# Altium PCB RK839.PcbDoc (part 3 of 3)
Units mm, origin at the board's own origin, x right, y up, seen from the top; angles counter-clockwise.
Board outline 303.12 x 189.36 mm, 2 copper layers (TopLayer, BottomLayer); 307 components, 971 nets, 714 pads, 1012 vias.
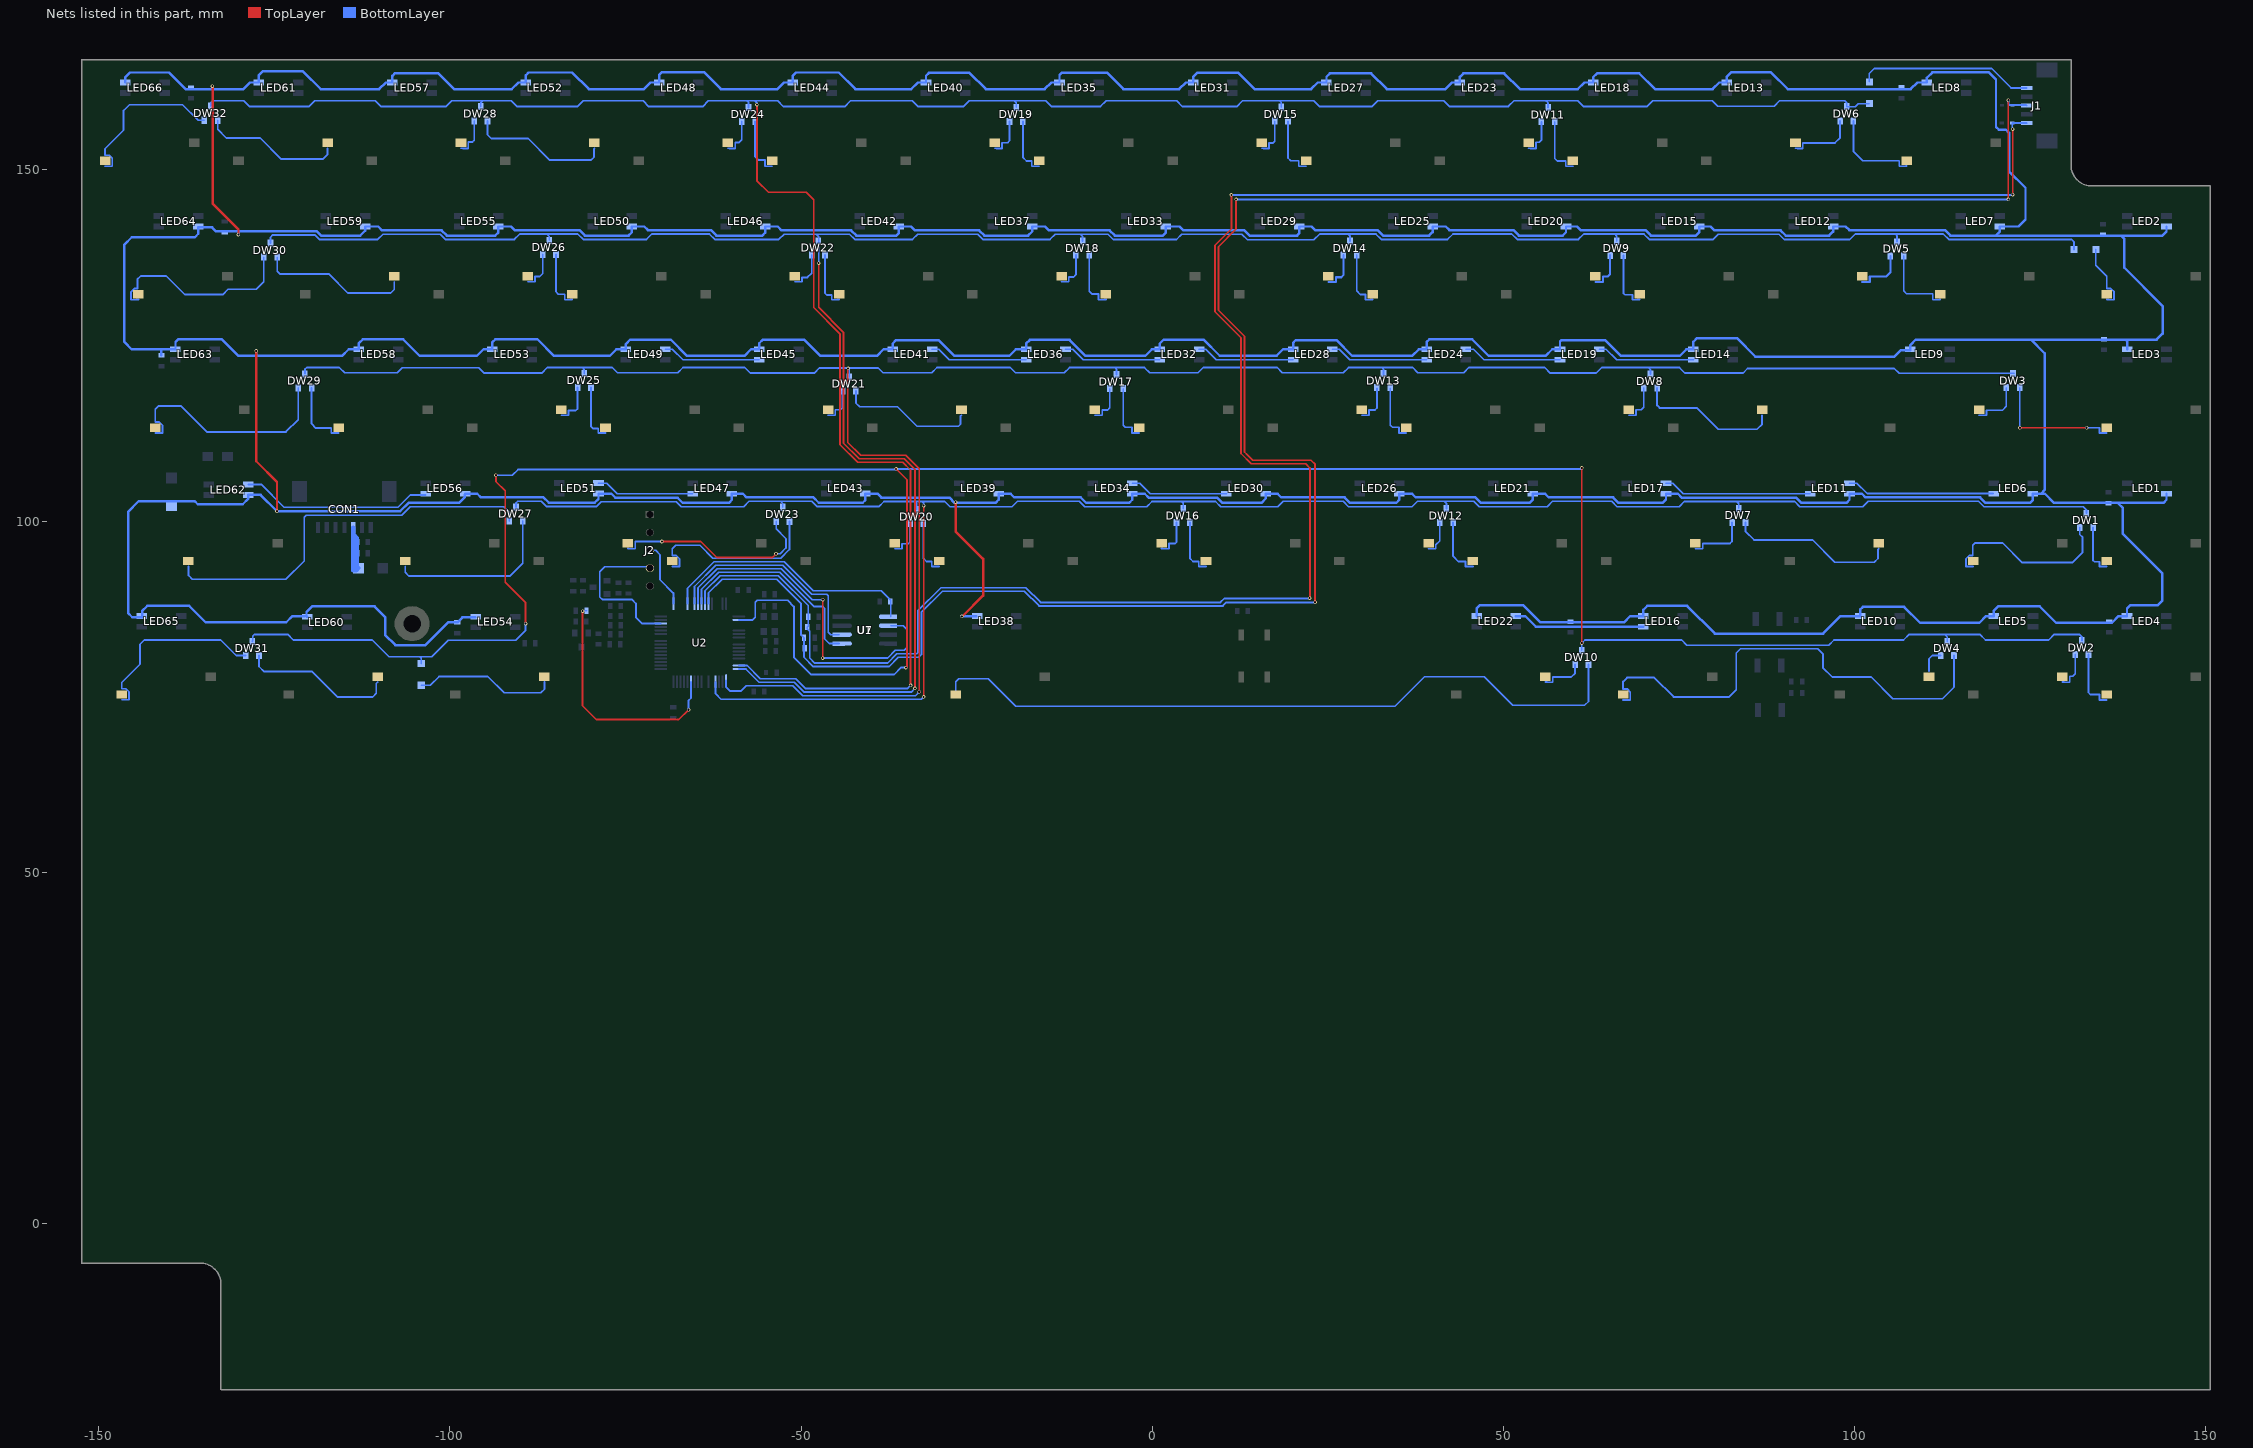
[diagram p3: the nets of this part, all layers, seen from the top]

## Via types
v1: diameter 0.5, hole 0.3, TopLayer to BottomLayer, tented both sides, 1012 vias

## Nets (pads, with @x,y where several pads share a name; then routed paths per layer and width w, separated by ;. In a path a pad name is that pad's centre, name@x,y a point inside that pad or via, vN(x,y) a via of type N, cw(c..) or ccw(c..) an arc to the next point about the centre after c; other vN are vias at no path point) (continued)
LEDVCC: C1.1 C2.2 C3.2 C4.1 C5.2 C6.1 C23.1 C25.2 C26.2 C27.1 LED1.4 LED2.4 LED3.4 LED4.4 LED5.4 LED6.4 LED7.4 LED8.4 LED9.4 LED10.4 LED11.4 LED12.4 LED13.4 LED14.4 LED15.4 LED16.4 LED17.4 LED18.4 LED19.4 LED20.4 LED21.4 LED22.4 LED23.4 LED24.4 LED25.4 LED26.4 LED27.4 LED28.4 LED29.4 LED30.4 LED31.4 LED32.4 LED33.4 LED34.4 LED35.4 LED36.4 LED37.4 LED38.4 LED39.4 LED40.4 LED41.4 LED42.4 LED43.4 LED44.4 LED45.4 LED46.4 LED47.4 LED48.4 LED49.4 LED50.4 LED51.4 LED52.4 LED53.4 LED54.4 LED55.4 LED56.4 LED57.4 LED58.4 LED59.4 LED60.4 LED61.4 LED62.4 LED63.4 LED64.4 LED65.4 LED66.4 R15.2 | length 1599.9
  TopLayer w0.35: v1(-133.825,161.95) -133.8,161.925 -133.8,145.197 -130.106,141.504 v1(-130.106,140.8) ; v1(-127.575,124.25) -127.575,108.525 -124.626,105.576 v1(-124.626,101.401) ; v1(-28,102.7) -28,98.525 -24.1,94.625 -24.1,89.4 -27.06,86.44 v1(-27.125,86.44)
  BottomLayer w0.35: LED66.4@-146.2,162.45 -146.2,163.225 -145.55,163.875 -140,163.875 -137.625,161.5 -133.825,161.5 ; C27.1@-141.075,123.587 -141.075,124.275 -141.275,124.475 ; v1(-133.825,161.95) -133.825,161.5 ; v1(-130.106,140.8) -130.106,141.094 -129.9,141.3 ; v1(-127.575,124.25) -127.575,123.7 -127.75,123.525 ; LED60.4@-120.675,86.475 -122.425,86.475 -123.3,85.6 -134.785,85.6 -137.11,87.925 -143.1,87.925 -143.84,87.185 -143.84,86.31 -145.234,86.31 -145.825,86.901 -145.825,101.325 -144.3,102.85 -136.35,102.85 -135.906,102.406 -129.5,102.406 -128.731,103.175 LED62.4@-128.731,103.726 -126.95,103.726 v1(-124.626,101.401) -107.099,101.401 -105.894,102.606 -98.705,102.606 -97.861,103.45 LED56.4@-97.861,103.728 ; LED60.4@-120.325,86.375 -120.425,86.475 -120.425,87.05 -119.625,87.85 -110.725,87.85 -109.225,86.35 -109.225,83.8 -107.776,82.351 -103.499,82.351 -100.263,85.587 C23.1@-98.95,85.587 -98.237,86.3 LED54.4@-96.425,86.3 ; LED56.4@-97.85,103.9 -96.113,103.9 -95.596,103.383 -86.683,103.383 -85.922,102.622 -79.402,102.622 -78.85,103.175 -78.85,103.9 -77.013,103.9 -76.438,103.325 -67.575,103.325 -66.856,102.606 -60.294,102.606 -59.86,103.04 LED47.4@-59.86,103.9 -58.278,103.9 -57.761,103.383 -48.249,103.383 -47.489,102.623 -41.227,102.623 -40.85,103 LED43.4@-40.85,103.925 -39.153,103.925 -38.578,103.35 -28.9,103.35 -28.156,102.606 -28,102.606 -22.319,102.606 -21.875,103.05 LED39.4@-21.875,103.9 -20.178,103.9 -19.661,103.383 -10.183,103.383 -9.406,102.606 -3.294,102.606 -2.85,103.05 LED34.4@-2.85,103.9 -1.078,103.9 -0.528,103.35 9.225,103.35 9.969,102.606 15.531,102.606 16.15,103.225 LED30.4@16.15,103.9 17.847,103.9 18.364,103.383 27.392,103.383 28.169,102.606 34.731,102.606 35.15,103.025 LED26.4@35.15,103.9 36.997,103.9 37.514,103.383 46.017,103.383 46.794,102.606 53.731,102.606 54.139,103.014 LED21.4@54.139,103.9 55.922,103.9 56.439,103.383 65.617,103.383 66.394,102.606 72.656,102.606 73.137,103.087 LED17.4@73.137,103.9 74.822,103.9 75.372,103.35 91.675,103.35 92.425,102.6 98.825,102.6 99.265,103.04 LED11.4@99.265,103.9 101.047,103.9 101.564,103.383 117.867,103.383 118.644,102.606 124.981,102.606 125.38,103.005 LED6.4@125.38,103.9 126.5,103.9 ; v1(-27.125,86.44) -25.117,86.44 LED38.4@-25.082,86.475 ; LED22.4@46.175,86.475 46.175,87.575 46.65,88.05 52.8,88.05 55.275,85.575 59.55,85.575 67.15,85.575 68.05,86.475 LED16.4@69.925,86.475 69.925,87.375 70.475,87.925 76.151,87.925 80.101,83.975 95.51,83.975 98.01,86.475 LED10.4@100.798,86.475 100.798,87.423 101.175,87.8 107.05,87.8 109.325,85.525 117.75,85.525 118.7,86.475 LED5.4@119.789,86.475 119.789,87.214 120.425,87.85 126.35,87.85 128.675,85.525 136.231,85.525 136.632,85.525 137.582,86.475 LED4.4@138.775,86.475 138.775,87.575 139.213,88.012 143.137,88.012 143.825,88.7 143.825,92.547 138.2,98.172 138.2,101.856 137.45,102.606 ; LED3.4@138.8,124.475 138.8,125.65 138.6,125.85 ; LED1.4@144.4,103.9 144.4,103.05 143.956,102.606 137.45,102.606 ; LED2.4@144.4,141.95 144.4,141.225 143.831,140.656 137.925,140.656 ; -141.275,124.475 LED63.4@-139.077,124.475 -139.077,125.498 -138.7,125.875 -132.475,125.875 -130.125,123.525 -127.75,123.525 ; -141.275,124.475 -145.322,124.475 -146.35,125.503 -146.35,139.375 -145.3,140.425 -136.325,140.425 -135.836,140.914 -135.836,141.816 -133.868,141.816 -133.353,141.3 -132.075,141.3 -129.9,141.3 ; -133.825,161.5 -129.4,161.5 -128.45,162.45 LED61.4@-127.201,162.45 -127.201,163.499 -126.675,164.025 -120.925,164.025 -118.4,161.5 -110.075,161.5 -109.125,162.45 LED57.4@-108.201,162.45 -108.201,163.399 -107.8,163.8 -101.725,163.8 -99.425,161.5 -91.2,161.5 -90.25,162.45 LED52.4@-89.201,162.45 -89.201,163.474 -88.8,163.875 -82.6,163.875 -80.225,161.5 -72.375,161.5 -71.425,162.45 LED48.4@-70.226,162.45 -70.226,163.499 -69.8,163.925 -63.852,163.925 -61.427,161.5 -53.375,161.5 -52.425,162.45 LED44.4@-51.216,162.45 -51.216,163.384 -50.725,163.875 -44.65,163.875 -42.275,161.5 -34.325,161.5 -33.375,162.45 LED40.4@-32.221,162.45 -32.221,163.404 -31.8,163.825 -26.025,163.825 -23.7,161.5 -15.325,161.5 -14.375,162.45 LED35.4@-13.212,162.45 -13.212,163.513 -12.875,163.85 -6.475,163.85 -4.125,161.5 3.825,161.5 4.775,162.45 LED31.4@5.799,162.45 5.799,163.222 6.427,163.85 12.225,163.85 14.575,161.5 22.6,161.5 23.55,162.45 LED27.4@24.799,162.45 24.799,163.274 25.275,163.75 31.15,163.75 33.4,161.5 41.725,161.5 42.675,162.45 LED23.4@43.799,162.45 43.799,163.249 44.3,163.75 50.1,163.75 52.35,161.5 60.575,161.5 61.525,162.45 LED18.4@62.789,162.45 62.789,163.214 63.325,163.75 69.325,163.75 71.575,161.5 79.775,161.5 80.725,162.45 LED13.4@81.799,162.45 81.799,163.295 82.404,163.9 88.075,163.9 90.475,161.5 107.975,161.5 108.925,162.45 LED8.4@110.294,162.45 110.294,163.119 111.075,163.9 119.1,163.9 120.125,162.875 120.125,156.125 120.525,155.725 121.55,155.725 122,155.275 122,149.797 124.325,147.472 124.325,142.95 123.325,141.95 LED7.4@120.675,141.95 120.675,141.25 120.081,140.656 ; -129.9,141.3 -119,141.3 -118.356,140.656 -112.769,140.656 -112.075,141.35 LED59.4@-112.075,141.95 -110.203,141.95 -109.653,141.4 -101.175,141.4 -100.431,140.656 -93.544,140.656 -93.1,141.1 LED55.4@-93.1,141.95 -91.303,141.95 -90.786,141.433 -81.558,141.433 -80.781,140.656 -74.569,140.656 -74.1,141.125 LED50.4@-74.1,141.95 -72.328,141.95 -71.811,141.433 -62.833,141.433 -62.056,140.656 -55.519,140.656 -55.1,141.075 LED46.4@-55.1,141.95 -53.328,141.95 -52.778,141.4 -42.886,141.4 -42.142,140.656 -36.444,140.656 -36.075,141.025 LED42.4@-36.075,141.95 -34.353,141.95 -33.803,141.4 -24.65,141.4 -23.906,140.656 -17.694,140.656 -17.1,141.25 LED37.4@-17.1,141.95 -15.253,141.95 -14.703,141.4 -6.075,141.4 -5.325,140.65 1.525,140.65 1.9,141.025 LED33.4@1.9,141.95 3.872,141.95 4.422,141.4 13.1,141.4 13.844,140.656 20.606,140.656 20.9,140.95 LED29.4@20.9,141.95 22.647,141.95 23.164,141.433 32.067,141.433 32.844,140.656 39.406,140.656 39.9,141.15 LED25.4@39.9,141.95 41.772,141.95 42.289,141.433 51.417,141.433 52.186,140.664 58.439,140.664 58.9,141.125 LED20.4@58.9,141.95 60.472,141.95 60.989,141.433 70.217,141.433 70.994,140.656 77.406,140.656 77.9,141.15 LED15.4@77.9,141.95 79.497,141.95 80.047,141.4 89.45,141.4 90.194,140.656 90.946,140.656 90.952,140.65 96.35,140.65 96.925,141.225 LED12.4@96.925,141.95 98.722,141.95 99.239,141.433 112.842,141.433 113.619,140.656 120.081,140.656 ; -127.75,123.525 -115.35,123.525 -114.4,124.475 LED58.4@-112.957,124.475 -112.957,125.343 -112.4,125.9 -106.675,125.9 -104.3,123.525 -96.175,123.525 -95.225,124.475 LED53.4@-93.947,124.475 -93.947,125.478 -93.525,125.9 -87.55,125.9 -85.175,123.525 -77.25,123.525 -76.3,124.475 LED49.4@-74.957,124.475 -74.957,125.218 -74.35,125.825 -68.525,125.825 -66.225,123.525 -58.075,123.525 -57.125,124.475 LED45.4@-55.954,124.475 -55.954,125.321 -55.475,125.8 -49.525,125.8 -47.25,123.525 -39.2,123.525 -38.25,124.475 LED41.4@-36.957,124.475 -36.957,125.293 -36.475,125.775 -30.425,125.775 -28.175,123.525 -20.375,123.525 -19.425,124.475 LED36.4@-17.96,124.475 -17.96,125.265 -17.425,125.8 -11.775,125.8 -9.5,123.525 -1,123.525 -0.05,124.475 LED32.4@1.053,124.475 1.053,125.278 1.625,125.85 7.3,125.85 9.6,123.55 17.7,123.55 18.625,124.475 LED28.4@20.04,124.475 20.04,125.388 20.427,125.775 26.225,125.775 28.475,123.525 37,123.525 37.95,124.475 LED24.4@39.043,124.475 39.043,125.493 39.448,125.898 45.527,125.898 47.9,123.525 56,123.525 56.95,124.475 LED19.4@58.048,124.475 58.048,125.548 58.275,125.775 64.475,125.775 66.725,123.525 75.1,123.525 76.05,124.475 LED14.4@77.043,124.475 77.043,125.543 77.55,126.05 83.225,126.05 85.85,123.425 105.65,123.425 106.575,124.35 107.923,124.35 LED9.4@107.923,124.475 107.923,125.073 108.7,125.85 125.1,125.85 ; 120.081,140.656 135.375,140.656 137.925,140.656 ; 125.1,125.85 135.5,125.85 138.6,125.85 ; 125.1,125.85 127.05,123.9 127.05,104.45 126.5,103.9 ; 126.5,103.9 127.075,103.9 128.369,102.606 136.15,102.606 137.45,102.606 ; 137.925,140.656 138.402,140.179 138.402,136.075 143.85,130.628 143.85,126.7 143,125.85 138.6,125.85
LG: 
LG1: 
LG2: 
LG3: 
LG4: 
LM: 
LR1: 
LR2: 
LR3: 
LR4: 
LVD: 
LX: 
MCU_RX: 
MCU_TX: 
MISO: 
MISO-A: 
MISOA: 
MOSI: 
MOSI-A: 
MOSIA: 
MOT: 
MOT-A: 
N18232214A: 
N18232222A: 
N18232230A: 
N18232238A: 
N18232246A: 
N18232254A: 
N18232262A: 
N18232270A: 
N18232278A: 
N18232286A: 
N18232294A: 
N18232302A: LED11.3 LED17.1 | length 21.1
  BottomLayer w0.25: LED17.1@73.137,105.4 74.1,105.4 75.6,103.9 LED11.3@93.665,103.9
N18232310A: LED6.3 LED11.1 | length 21.1
  BottomLayer w0.25: LED11.1@99.265,105.4 100.325,105.4 101.792,103.933 LED6.3@119.747,103.933
N18232326A: 
N18232788A: 
N18232796A: 
N18232804A: 
N18232812A: 
N18232820A: 
N18232828A: 
N18232836A: 
N18232844A: 
N18232852A: 
N18232860A: 
N18232868A: 
N18232876A: 
N18232884A: 
N18232892A: 
N18232900A: 
N18233368A: 
N18233376A: 
N18233384A: 
N18233392A: 
N18233400A: 
N18233408A: 
N18233416A: 
N18233424A: 
N18233432A: 
N18233440A: 
N18233448A: 
N18233456A: 
N18233464A: 
N18233472A: 
N18233480A: 
N18233921A: 
N18233929A: 
N18233937A: LED45.1 LED49.3 | length 14
  BottomLayer w0.25: LED49.3@-69.357,124.475 -68.325,124.475 -66.825,122.975 LED45.1@-55.954,122.975
N18233945A: 
N18233953A: 
N18233961A: 
N18233969A: 
N18233977A: 
N18233985A: 
N18233993A: 
N18234001A: 
N18234009A: LED36.1 LED41.3 | length 14
  BottomLayer w0.25: LED41.3@-31.357,124.475 -30.425,124.475 -28.925,122.975 LED36.1@-17.96,122.975
N18234017A: 
N18234025A: LED32.1 LED36.3 | length 14
  BottomLayer w0.25: LED36.3@-12.36,124.475 -11.325,124.475 -9.825,122.975 LED32.1@1.053,122.975
N18234465A: 
N18234473A: 
N18234481A: 
N18234489A: 
N18234497A: LED28.1 LED32.3 | length 14
  BottomLayer w0.25: LED32.3@6.653,124.475 7.625,124.475 9.125,122.975 LED28.1@20.04,122.975
N18234505A: 
N18234513A: LED24.1 LED28.3 | length 14
  BottomLayer w0.25: LED28.3@25.64,124.475 26.625,124.475 28.125,122.975 LED24.1@39.043,122.975
N18234521A: 
N18234529A: LED19.1 LED24.3 | length 14
  BottomLayer w0.25: LED24.3@44.643,124.475 45.725,124.475 47.225,122.975 LED19.1@58.048,122.975
N18234537A: 
N18234545A: 
N18234553A: LED14.1 LED19.3 | length 14
  BottomLayer w0.25: LED19.3@63.648,124.475 64.6,124.475 66.1,122.975 LED14.1@77.043,122.975
N18234561A: 
N18234569A: 
N18234932A: 
N18234940A: 
N18234948A: 
N18234956A: 
N18234964A: 
N18234972A: 
N18234980A: 
N18234988A: 
N18234996A: 
NET01: LED56.3 LED62.1 | length 27.3
  BottomLayer w0.25: LED62.1@-128.731,105.226 -126.878,105.226 -123.629,101.976 -107.396,101.976 -105.645,103.728 LED56.3@-103.461,103.728
NET1: 
NET02: LED47.3 LED51.1 | length 14
  BottomLayer w0.25: LED51.1@-78.85,105.4 -77.7,105.4 -76.2,103.9 LED47.3@-65.46,103.9
NetD3_1: 
NetLED1_2: 
NetR5_1: 
NetR8_1: 
NewNet: 
NTC: 
NUM: 
NUM-1: 
"NumLock /LVD LOCK": 
OFF: 
ONKEY: 
P11: 
P11-A: 
P12: 
P13: 
P22: 
P33: 
P75: 
PA9: 
PA10: 
PB1: R12.2 U2.27 | length 34.8
  TopLayer w0.25: v1(-81.125,87.2) -81.125,73.7 -79.175,71.75 -67.425,71.75 v1(-66.025,73.15)
  BottomLayer w0.25: v1(-81.125,87.2) -81.175,87.25 R12.2@-80.555,87.25 ; v1(-66.025,73.15) -66.025,74.475 -65.68,74.82 U2.27@-65.68,77.14
Q1-1: 
Q1-2: 
Q2-1: 
Q2-2: 
Q3-1: 
Q3-2: 
Q20: 
q37: 
q37-b: 
QZ1_G: 
R0: 
R0-1: 
R0-C16: 
R0_C0: 
R0_C2: 
R0_C3: 
R0_C4: 
R0_C5: 
R0_C6: 
R0_C7: 
R0_C8: 
R0_C9: 
R0_C10: 
R0_C11: 
R0_C12: 
R0_C13: 
R0_C14: 
R0_C15: 
R0_C16: 
R0_C17: 
R0_C18: 
R0_C19: 
R0_C20: 
R0_C21: 
R1: DK2.1 DW6.1 DW11.1 DW15.1 DW19.1 DW24.1 DW28.1 DW32.1 U2.15 | length 376.1
  TopLayer w0.25: v1(-56.3,159.3) -56.3,148.475 -54.65,146.825 -49.275,146.825 -48.2,145.75 -48.2,130.418 -44.475,126.693 -44.475,110.911 -41.936,108.371 -35.521,108.371 -34.425,107.275 v1(-34.425,76.625)
  BottomLayer w0.25: DW32.1@-134.025,159.075 -134.025,159.6 -133.775,159.85 -129.353,159.85 -128.548,159.045 -120.03,159.045 -119.225,159.85 -110.653,159.85 -109.849,159.046 -100.529,159.046 -99.725,159.85 -95.325,159.85 ; DW28.1@-95.6,159 -95.6,159.575 -95.325,159.85 ; U2.15@-58.855,79.44 -57.658,79.44 -55.793,77.575 -50.786,77.575 -49.364,76.154 -34.896,76.154 v1(-34.425,76.625) ; DW24.1@-57.5,158.9 -57.5,159.625 -57.725,159.85 ; v1(-56.3,159.3) -56.3,159.55 -56.6,159.85 ; DW19.1@-19.375,158.925 -19.375,159.55 -19.675,159.85 ; DW15.1@18.375,158.95 18.375,159.6 18.125,159.85 ; DW11.1@56.35,158.875 56.35,159.536 56.036,159.85 ; DK2.1@102.086,159.441 100.516,159.441 100.075,159 DW6.1@98.875,159 98.875,159.575 98.6,159.85 89.3,159.85 88.525,159.075 80.522,159.075 79.747,159.85 71.275,159.85 70.475,159.05 61.372,159.05 60.572,159.85 56.036,159.85 ; -95.325,159.85 -91.278,159.85 -90.478,159.05 -81.8,159.05 -81,159.85 -72.503,159.85 -71.678,159.025 -64.025,159.025 -63.2,159.85 -57.725,159.85 ; -57.725,159.85 -56.6,159.85 ; -56.6,159.85 -53.328,159.85 -52.503,159.025 -43.8,159.025 -42.975,159.85 -34.178,159.85 -33.378,159.05 -26.847,159.05 -26.047,159.85 -19.675,159.85 ; -19.675,159.85 -15.175,159.85 -14.375,159.05 -7.375,159.05 -6.575,159.85 3.472,159.85 4.297,159.025 12.025,159.025 12.85,159.85 18.125,159.85 ; 18.125,159.85 22.972,159.85 23.777,159.045 31.295,159.045 32.1,159.85 41.497,159.85 42.297,159.05 50.7,159.05 51.5,159.85 56.036,159.85
R1-16: 
R1_C0: DW32.2 S1.2 | length 23.6
  BottomLayer w0.25: S1.2@-149.106,150.543 -148.997,150.543 -148.988,150.535 -148.856,150.535 -148.856,150.528 -148.065,150.528 -148.065,151.645 -148.528,152.108 -149.106,152.108 -149.106,153.019 -146.475,155.65 -146.475,158.45 -145.625,159.3 -138.075,159.3 -135.85,157.075 DW32.2@-134.975,157.075
R1_C1: DW32.3 S6.1 | length 19.8
  BottomLayer w0.25: DW32.3@-133.075,157.075 -133.075,155.8 -131.825,154.55 -127.025,154.55 -124.025,151.55 -118.1,151.55 -117.424,152.226 S6.1@-117.424,153.083
R1_C2: DW28.2 S10.1 | length 5.7
  BottomLayer w0.25: S10.1@-98.424,153.083 -98.315,153.083 -98.307,153.075 -98.174,153.075 -98.174,153.068 -97.383,153.068 -97.383,153.975 -96.8,153.975 -96.55,154.225 DW28.2@-96.55,157
R1_C3: DW28.3 S15.1 | length 20.1
  BottomLayer w0.25: DW28.3@-94.65,157 -94.65,155.025 -94.1,154.475 -88.847,154.475 -85.772,151.4 -79.925,151.4 -79.475,151.85 -79.475,153.031 S15.1@-79.424,153.083
R1_C4: DW24.2 S19.1 | length 5.6
  BottomLayer w0.25: S19.1@-60.434,153.083 -60.325,153.083 -60.317,153.075 -60.184,153.075 -60.184,153.068 -59.393,153.068 -59.393,153.925 -58.8,153.925 -58.45,154.275 DW24.2@-58.45,156.9
R1_C5: DW24.3 S23.2 | length 8.5
  BottomLayer w0.25: DW24.3@-56.55,156.9 -56.55,151.9 -56.05,151.4 -55.157,151.4 -55.157,150.528 -54.366,150.528 -54.366,150.535 -54.234,150.535 -54.225,150.543 S23.2@-54.116,150.543
R1_C6: DW19.2 S27.1 | length 5.8
  BottomLayer w0.25: S27.1@-22.434,153.083 -22.325,153.083 -22.317,153.075 -22.184,153.075 -22.184,153.068 -21.393,153.068 -21.393,153.875 -20.6,153.875 -20.325,154.15 DW19.2@-20.325,156.925
R1_C7: DW19.3 S32.2 | length 8.4
  BottomLayer w0.25: DW19.3@-18.425,156.925 -18.425,151.793 -17.907,151.275 -17.147,151.275 -17.147,150.528 -16.357,150.528 -16.357,150.535 -16.224,150.535 -16.216,150.543 S32.2@-16.107,150.543
R1_C8: DW15.2 S36.1 | length 5.6
  BottomLayer w0.25: S36.1@15.576,153.083 15.685,153.083 15.693,153.075 15.826,153.075 15.826,153.068 16.617,153.068 16.617,153.825 17.15,153.825 17.425,154.1 DW15.2@17.425,156.95
R1_C9: DW15.3 S40.2 | length 8.8
  BottomLayer w0.25: DW15.3@19.325,156.95 19.325,151.7 19.7,151.325 20.853,151.325 20.853,150.528 21.644,150.528 21.644,150.535 21.776,150.535 21.785,150.543 S40.2@21.894,150.543
R1_C10: DW11.2 S44.1 | length 5.5
  BottomLayer w0.25: S44.1@53.576,153.083 53.685,153.083 53.693,153.075 53.826,153.075 53.826,153.068 54.617,153.068 54.617,153.95 55.1,153.95 55.4,154.25 DW11.2@55.4,156.875
R1_C11: DW11.3 S49.2 | length 8.7
  BottomLayer w0.25: DW11.3@57.3,156.875 57.3,151.625 57.65,151.275 58.853,151.275 58.853,150.528 59.644,150.528 59.644,150.535 59.776,150.535 59.785,150.543 S49.2@59.894,150.543
R1_C12: DW6.2 S54.1 | length 9.9
  BottomLayer w0.25: S54.1@91.576,153.083 91.685,153.083 91.693,153.075 91.826,153.075 91.826,153.068 92.617,153.068 92.617,153.85 97.2,153.85 97.925,154.575 DW6.2@97.925,157
R1_C13: DW6.3 S59.2 | length 13.3
  BottomLayer w0.25: DW6.3@99.825,157 99.825,152.675 101.175,151.325 106.353,151.325 106.353,150.53 107.144,150.53 107.144,150.537 107.276,150.537 107.285,150.545 S59.2@107.394,150.545
R1_C14: DK2.2 J1.5 | length 25.1
  BottomLayer w0.25: DK2.2@102.086,162.541 102.086,163.736 102.8,164.45 119.5,164.45 122.275,161.675 J1.5@124.5,161.675
R1_C15: 
R1_C16: 
R1_C17: 
R1_C18: 
R1_C19: 
R1_C20: 
R1_C21: 
R2: DK1.1 DW5.1 DW9.1 DW14.1 DW18.1 DW22.1 DW26.1 DW30.1 U2.16 | length 373.5
  TopLayer w0.25: v1(-47.5,136.725) -47.5,130.425 -43.975,126.9 -43.975,111.118 -41.729,108.871 -35.304,108.871 -33.8,107.368 v1(-33.8,76.175)
  BottomLayer w0.25: DW30.1@-125.55,139.575 -125.55,140.425 -125.225,140.75 -119.228,140.75 -118.584,140.106 -110.275,140.106 -109.531,140.85 -101.403,140.85 -100.659,140.106 -90.819,140.106 -90.042,140.883 -86.208,140.883 ; DW26.1@-85.85,139.975 -85.85,140.525 -86.208,140.883 ; U2.16@-58.855,78.94 -57.865,78.94 -56,77.075 -50.993,77.075 -49.571,75.654 -34.321,75.654 v1(-33.8,76.175) v1@-33.725,76.25 ; v1(-47.5,136.725) -47.5,140.475 -47.875,140.85 ; DW18.1@-9.925,139.875 -9.925,140.525 -10.25,140.85 ; DW14.1@28.15,139.875 28.15,140.583 27.85,140.883 ; DW9.1@66.125,139.85 66.125,140.583 65.825,140.883 ; DW5.1@106.025,139.775 106.025,140.608 105.75,140.883 ; DK1.1@131.241,138.689 131.241,139.734 130.869,140.106 119.5,140.106 113.391,140.106 112.614,140.883 105.75,140.883 ; -86.208,140.883 -81.786,140.883 -81.009,140.106 -72.019,140.106 -71.242,140.883 -63.061,140.883 -62.284,140.106 -53.169,140.106 -52.425,140.85 -47.875,140.85 ; -47.875,140.85 -43.114,140.85 -42.37,140.106 -34.144,140.106 -33.4,140.85 -24.878,140.85 -24.134,140.106 -14.569,140.106 -13.825,140.85 -10.25,140.85 ; -10.25,140.85 -6.303,140.85 -5.553,140.1 3.444,140.1 4.194,140.85 12.76,140.85 13.56,140.05 23,140.05 23.833,140.883 27.85,140.883 ; 27.85,140.883 31.839,140.883 32.616,140.106 42.031,140.106 42.808,140.883 51.189,140.883 51.958,140.114 60.664,140.114 61.433,140.883 65.825,140.883 ; 65.825,140.883 69.989,140.883 70.766,140.106 79.856,140.106 80.6,140.85 89.222,140.85 89.972,140.1 99.3,140.1 100.083,140.883 105.75,140.883
R2_C0: DW30.2 S3.2 | length 28.1
  BottomLayer w0.25: S3.2@-144.354,131.546 -144.463,131.546 -144.471,131.538 -144.604,131.538 -144.604,131.531 -145.394,131.531 -145.394,132.648 -144.931,133.111 -144.5,133.111 -144.5,134.425 -144.025,134.9 -140.375,134.9 -137.725,132.25 -132.35,132.25 -131.6,133 -127.575,133 -126.5,134.075 DW30.2@-126.5,137.575
R2_C1: DW30.3 S8.1 | length 21.3
  BottomLayer w0.25: DW30.3@-124.6,137.575 -124.6,135.575 -124.225,135.2 -117.275,135.2 -114.55,132.475 -108.425,132.475 -107.921,132.979 S8.1@-107.921,134.086
R2_C2: DW26.2 S12.1 | length 5.8
  BottomLayer w0.25: S12.1@-88.921,134.085 -88.812,134.085 -88.803,134.077 -88.671,134.077 -88.671,134.07 -87.88,134.07 -87.88,134.825 -87.225,134.825 -86.8,135.25 DW26.2@-86.8,137.975
R2_C3: DW26.3 S17.2 | length 8.6
  BottomLayer w0.25: DW26.3@-84.9,137.975 -84.9,132.65 -84.563,132.313 -83.644,132.313 -83.644,131.53 -82.854,131.53 -82.854,131.537 -82.721,131.537 -82.713,131.546 S17.2@-82.604,131.546
R2_C4: DW22.2 S21.1 | length 5.9
  BottomLayer w0.25: S21.1@-50.924,134.086 -50.816,134.086 -50.807,134.077 -50.674,134.077 -50.674,134.07 -49.884,134.07 -49.884,134.7 -49.1,134.7 -48.5,135.3 DW22.2@-48.5,137.9
R2_C5: DW22.3 S25.2 | length 8.2
  BottomLayer w0.25: DW22.3@-46.6,137.9 -46.6,132.438 -46.362,132.2 -45.644,132.2 -45.644,131.53 -44.854,131.53 -44.854,131.537 -44.721,131.537 -44.713,131.546 S25.2@-44.604,131.546
R2_C6: DW18.2 S30.1 | length 5.7
  BottomLayer w0.25: S30.1@-12.924,134.086 -12.816,134.086 -12.807,134.077 -12.674,134.077 -12.674,134.07 -11.884,134.07 -11.884,134.75 -11.225,134.75 -10.875,135.1 DW18.2@-10.875,137.875
R2_C7: DW18.3 S34.2 | length 8.5
  BottomLayer w0.25: DW18.3@-8.975,137.875 -8.975,132.75 -8.55,132.325 -7.644,132.325 -7.644,131.532 -6.854,131.532 -6.854,131.539 -6.721,131.539 -6.713,131.548 S34.2@-6.604,131.548
R2_C8: DW14.2 S38.1 | length 5.8
  BottomLayer w0.3: S38.1@25.076,134.061 25.176,134.061 25.185,134.052 25.326,134.052 25.326,134.045 26.141,134.045 26.141,134.725 26.9,134.725 27.2,135.025 DW14.2@27.2,137.875
R2_C9: DW14.3 S42.2 | length 8.3
  BottomLayer w0.25: DW14.3@29.1,137.875 29.1,132.8 29.65,132.25 30.356,132.25 30.356,131.53 31.146,131.53 31.146,131.537 31.279,131.537 31.287,131.546 S42.2@31.396,131.546
R2_C10: DW9.2 S47.1 | length 5.7
  BottomLayer w0.3: S47.1@63.079,134.061 63.179,134.061 63.188,134.052 63.329,134.052 63.329,134.045 64.144,134.045 64.144,134.85 64.875,134.85 65.175,135.15 DW9.2@65.175,137.85
R2_C11: DW9.3 S52.2 | length 8.5
  BottomLayer w0.25: DW9.3@67.075,137.85 67.075,132.45 67.3,132.225 68.356,132.225 68.356,131.532 69.146,131.532 69.146,131.539 69.279,131.539 69.287,131.548 S52.2@69.396,131.548
R2_C12: DW5.2 S55.1 | length 7.4
  BottomLayer w0.3: S55.1@101.079,134.063 101.179,134.063 101.188,134.054 102.144,134.054 102.144,134.85 104.525,134.85 105.075,135.4 DW5.2@105.075,137.775
R2_C13: DW5.3 S60.2 | length 11.2
  BottomLayer w0.25: DW5.3@106.975,137.775 106.975,132.775 107.375,132.375 111.127,132.375 111.127,131.522 111.917,131.522 111.917,131.529 112.05,131.529 112.059,131.538 S60.2@112.167,131.538
R2_C14: DK1.2 S65.2 | length 9.6
  BottomLayer w0.25: DK1.2@134.341,138.689 134.341,136.409 135.894,134.856 135.894,133.11 136.471,133.11 136.934,132.647 136.934,131.53 136.144,131.53 136.144,131.537 136.011,131.537 136.002,131.545 S65.2@135.894,131.545
R2_C15: 
R2_C16: 
R2_C17: 
R2_C18: 
R2_C19: 
R2_C20: 
R2_C21: 
R03: 
R3: DW3.1 DW8.1 DW13.1 DW17.1 DW21.1 DW25.1 DW29.1 U2.17 | length 340.7
  TopLayer w0.25: v1(-43.3,121.75) -43.35,121.7 -43.35,111.2 -41.521,109.371 -35.096,109.371 -33.175,107.45 v1(-33.175,75.7)
  BottomLayer w0.25: DW29.1@-120.65,120.975 -120.65,121.625 -120.4,121.875 -115.75,121.875 -115,121.125 -107.5,121.125 -106.775,121.85 -95.875,121.85 -95.1,121.075 -86.95,121.075 -86.15,121.875 -81.2,121.875 ; DW25.1@-80.875,121.025 -80.875,121.55 -81.2,121.875 ; U2.17@-60.68,77.3 -60.68,76.355 -60.668,76.343 ; -60.655,76.355 -60.1,75.8 -58.575,75.8 -57.8,76.575 -51.2,76.575 -49.779,75.154 -33.721,75.154 v1(-33.175,75.7) ; DW21.1@-43.15,120.525 -43.15,121.6 v1(-43.3,121.75) v1@-43.35,121.8 ; DW17.1@-5.1,120.85 -5.1,121.6 -5.375,121.875 ; DW13.1@32.925,120.875 32.925,121.6 32.65,121.875 ; DW8.1@70.925,120.95 70.925,121.55 70.6,121.875 ; DW3.1@122.677,121.048 121.725,121.048 106.327,121.048 105.65,121.725 84.75,121.725 84.1,121.075 75.85,121.075 75.05,121.875 70.6,121.875 ; -81.2,121.875 -76.9,121.875 -76.15,121.125 -67.575,121.125 -66.825,121.875 -58.015,121.875 -57.213,121.073 -48.125,121.073 -47.398,121.8 v1@-43.35,121.8 ; v1@-43.35,121.8 -39.012,121.8 -38.337,121.125 -31.4,121.125 -30.65,121.875 -20.228,121.875 -19.484,121.131 -12.516,121.131 -11.772,121.875 -5.375,121.875 ; -5.375,121.875 -1.125,121.875 -0.375,121.125 6.5,121.125 7.25,121.875 17.775,121.875 18.525,121.125 27.2,121.125 27.95,121.875 32.65,121.875 ; 32.65,121.875 37.075,121.875 37.819,121.131 44.334,121.131 45.078,121.875 55.872,121.875 56.672,121.075 63.175,121.075 63.975,121.875 70.6,121.875
R3-C16: 
R3_C0: DW29.2 S4.2 | length 32.6
  BottomLayer w0.25: S4.2@-141.97,112.546 -141.861,112.546 -141.852,112.537 -141.72,112.537 -141.72,112.53 -140.929,112.53 -140.929,113.648 -141.392,114.111 -141.97,114.111 -141.97,115.905 -141.475,116.4 -138.325,116.4 -134.625,112.7 -123.35,112.7 -121.6,114.45 DW29.2@-121.6,118.975
R3_C1: DW29.3 S9.2 | length 10
  BottomLayer w0.25: DW29.3@-119.7,118.975 -119.7,113.85 -119.1,113.25 -116.89,113.25 -116.89,112.532 -116.1,112.532 -116.1,112.539 -115.967,112.539 -115.958,112.548 S9.2@-115.85,112.548
R3_C2: DW25.2 S14.1 | length 6.1
  BottomLayer w0.25: S14.1@-84.167,115.088 -84.058,115.088 -84.05,115.079 -83.917,115.079 -83.917,115.072 -83.127,115.072 -83.127,115.75 -82.1,115.75 -81.825,116.025 DW25.2@-81.825,119.025
R3_C3: DW25.3 S18.2 | length 8.4
  BottomLayer w0.25: DW25.3@-79.925,119.025 -79.925,113.495 -79.605,113.175 -78.89,113.175 -78.89,112.53 -78.1,112.53 -78.1,112.537 -77.967,112.537 -77.958,112.546 S18.2@-77.85,112.546
R3_C4: DW21.2 S22.1 | length 5.3
  BottomLayer w0.25: S22.1@-46.169,115.085 -46.06,115.085 -46.052,115.077 -45.129,115.077 -45.129,115.85 -44.425,115.85 -44.1,116.175 DW21.2@-44.1,118.525
R3_C5: DW21.3 S26.1 | length 19.4
  BottomLayer w0.25: DW21.3@-42.2,118.525 -42.2,116.825 -41.675,116.3 -36.275,116.3 -33.5,113.525 -27.6,113.525 -27.3,113.825 -27.3,114.955 S26.1@-27.167,115.088
R3_C6: DW17.2 S31.1 | length 5.7
  BottomLayer w0.25: S31.1@-8.18,115.086 -8.071,115.086 -8.063,115.077 -7.93,115.077 -7.93,115.07 -7.14,115.07 -7.14,115.825 -6.35,115.825 -6.05,116.125 DW17.2@-6.05,118.85
R3_C7: DW17.3 S35.2 | length 8.5
  BottomLayer w0.25: DW17.3@-4.15,118.85 -4.15,113.675 -3.85,113.375 -2.89,113.375 -2.89,112.532 -2.1,112.532 -2.1,112.539 -1.967,112.539 -1.958,112.548 S35.2@-1.85,112.548
R3_C8: DW13.2 S39.1 | length 5.8
  BottomLayer w0.25: S39.1@29.82,115.086 29.929,115.086 29.937,115.077 30.07,115.077 30.07,115.07 30.86,115.07 30.86,115.825 31.7,115.825 31.975,116.1 DW13.2@31.975,118.875
R3_C9: DW13.3 S43.2 | length 8.4
  BottomLayer w0.25: DW13.3@33.875,118.875 33.875,113.675 34.2,113.35 35.11,113.35 35.11,112.532 35.9,112.532 35.9,112.539 36.033,112.539 36.042,112.548 S43.2@36.15,112.548
R3_C10: DW8.2 S48.1 | length 5.8
  BottomLayer w0.25: S48.1@67.833,115.086 67.942,115.086 67.95,115.077 68.873,115.077 68.873,115.85 69.6,115.85 69.975,116.225 DW8.2@69.975,118.95
R3_C11: DW8.3 S53.1 | length 20.4
  BottomLayer w0.25: DW8.3@71.875,118.95 71.875,116.475 72.225,116.125 77.525,116.125 80.575,113.075 86.1,113.075 86.825,113.8 86.825,115.08 S53.1@86.833,115.088
R3_C12: 
R3_C13: DW3.2 S58.1 | length 7.5
  BottomLayer w0.25: S58.1@117.713,115.086 117.822,115.086 117.83,115.077 117.963,115.077 117.963,115.07 118.753,115.07 118.753,115.8 121.05,115.8 121.6,116.35 DW3.2@121.6,119
R3_C14: DW3.3 S66.2 | length 18.9
  TopLayer w0.25: v1(123.525,113.3) v1(133.025,113.3)
  BottomLayer w0.25: DW3.3@123.5,119 123.5,113.325 v1(123.525,113.3) ; v1(133.025,113.3) 134.858,113.3 134.858,112.53 135.648,112.53 135.648,112.537 135.781,112.537 135.789,112.545 S66.2@135.898,112.545
R3_C15: 
R3_C16: 
R3_C17: 
R3_C18: 
R3_C19: 
R3_C20: 
R4: DW1.1 DW7.1 DW12.1 DW16.1 DW20.1 DW23.1 DW27.1 U2.20 | length 296.9
  TopLayer w0.25: v1(-32.55,74.975) v1(-32.55,102.2)
  BottomLayer w0.25: DW27.1@-90.601,102.026 -90.601,102.582 -90.35,102.833 -86.983,102.833 -86.222,102.072 -79.175,102.072 -78.472,102.775 -67.803,102.775 -67.084,102.056 -58.194,102.056 -57.417,102.833 -52.925,102.833 ; U2.20@-62.18,77.14 -62.18,75.43 -61.404,74.654 -32.871,74.654 v1(-32.55,74.975) ; DW23.1@-52.6,101.975 -52.6,102.508 -52.925,102.833 ; DW20.1@-33.55,101.65 -33.55,102.5 -33.85,102.8 ; v1(-32.55,102.2) -32.55,102.55 -32.8,102.8 ; DW16.1@4.4,101.8 4.4,102.525 4.125,102.8 ; DW12.1@41.875,101.8 41.875,102.533 41.575,102.833 ; DW7.1@83.5,101.825 83.5,102.45 83.15,102.8 ; DW1.1@133,101.12 133,101.625 132.569,102.056 118.416,102.056 117.639,102.833 101.933,102.833 101.15,102.05 92.197,102.05 91.447,102.8 83.15,102.8 ; -52.925,102.833 -48.477,102.833 -47.717,102.073 -38.927,102.073 -38.2,102.8 -33.85,102.8 ; -33.85,102.8 -32.8,102.8 ; -32.8,102.8 -29.553,102.8 -28.809,102.056 -19.969,102.056 -19.192,102.833 -10.411,102.833 -9.634,102.056 -0.794,102.056 -0.05,102.8 4.125,102.8 ; 4.125,102.8 8.997,102.8 9.741,102.056 17.856,102.056 18.633,102.833 27.164,102.833 27.941,102.056 36.981,102.056 37.758,102.833 41.575,102.833 ; 41.575,102.833 45.789,102.833 46.566,102.056 56.206,102.056 56.983,102.833 65.389,102.833 66.166,102.056 75.006,102.056 75.75,102.8 83.15,102.8
R4-C16: 
R4_C0: DW27.2 S5.2 | length 56.7
  BottomLayer w0.25: S5.2@-137.226,93.545 -137.226,92.276 -136.675,91.725 -123.35,91.725 -120.75,94.325 -120.75,100.575 -120.474,100.851 -106.871,100.851 -105.672,102.05 -92.325,102.05 -91.551,101.276 DW27.2@-91.551,100.026
R4_C1: DW27.3 S11.2 | length 24.5
  BottomLayer w0.25: S11.2@-106.356,93.547 -106.356,92.706 -105.825,92.175 -91.5,92.175 -89.651,94.024 DW27.3@-89.651,100.026
R4_C2: DW23.2 S16.1 | length 29.5
  TopLayer w0.25: v1(-69.825,97.1) -64.275,97.1 -61.981,94.806 -54.094,94.806 -53.578,95.322 v1(-53.578,95.355)
  BottomLayer w0.25: S16.1@-74.673,96.085 -74.565,96.085 -74.556,96.077 -74.423,96.077 -74.423,96.07 -73.633,96.07 -73.633,97.1 v1(-69.825,97.1) ; v1(-53.578,95.355) -52.977,95.355 -52.15,96.182 -52.15,97.5 -53.55,98.9 DW23.2@-53.55,99.975
R4_C3: DW23.3 S20.2 | length 26.5
  BottomLayer w0.25: S20.2@-68.356,93.547 -68.247,93.547 -68.239,93.539 -68.106,93.539 -68.106,93.532 -67.316,93.532 -67.316,94.649 -67.779,95.112 -68.356,95.112 -68.356,96.044 -67.825,96.575 -64.4,96.575 -62.555,94.73 -52.895,94.73 -51.65,95.975 DW23.3@-51.65,99.975
R4_C4: DW20.2 S24.1 | length 5.6
  BottomLayer w0.25: S24.1@-36.676,96.084 -36.567,96.084 -36.558,96.076 -36.426,96.076 -36.426,96.069 -35.635,96.069 -35.635,96.775 -34.75,96.775 -34.5,97.025 DW20.2@-34.5,99.65
R4_C5: DW20.3 S28.2 | length 8.1
  BottomLayer w0.25: DW20.3@-32.6,99.65 -32.6,94.7 -32.15,94.25 -31.396,94.25 -31.396,93.532 -30.606,93.532 -30.606,93.539 -30.473,93.539 -30.465,93.547 S28.2@-30.356,93.547
R4_C6: DW16.2 S33.1 | length 5.7
  BottomLayer w0.25: S33.1@1.327,96.087 1.435,96.087 1.444,96.079 1.577,96.079 1.577,96.072 2.367,96.072 2.367,96.825 3.25,96.825 3.45,97.025 DW16.2@3.45,99.8
R4_C7: DW16.3 S37.2 | length 8.3
  BottomLayer w0.25: DW16.3@5.35,99.8 5.35,94.7 5.8,94.25 6.604,94.25 6.604,93.531 7.394,93.531 7.394,93.538 7.527,93.538 7.535,93.546 S37.2@7.644,93.546
R4_C8: DW12.2 S41.1 | length 5
  BottomLayer w0.25: S41.1@39.327,96.084 39.436,96.084 39.445,96.076 39.577,96.076 39.577,96.069 40.368,96.069 40.368,96.618 40.925,97.175 DW12.2@40.925,99.8
R4_C9: DW12.3 S46.2 | length 8.7
  BottomLayer w0.25: DW12.3@42.825,99.8 42.825,95 43.575,94.25 44.604,94.25 44.604,93.532 45.394,93.532 45.394,93.539 45.527,93.539 45.535,93.547 S46.2@45.644,93.547
R4_C10: DW7.2 S50.1 | length 8.8
  BottomLayer w0.25: S50.1@77.324,96.084 77.433,96.084 77.442,96.076 77.574,96.076 77.574,96.069 78.365,96.069 78.365,96.825 82.25,96.825 82.55,97.125 DW7.2@82.55,99.825
R4_C11: 
R4_C12: 
R4_C13: DW7.3 S56.1 | length 23.6
  BottomLayer w0.25: DW7.3@84.45,99.825 84.45,98.55 85.675,97.325 94,97.325 97.175,94.15 102.8,94.15 103.325,94.675 103.325,95.967 S56.1@103.443,96.085
R4_C14: 
R4_C15: DW1.2 S61.2 | length 26
  BottomLayer w0.25: S61.2@116.891,93.545 116.782,93.545 116.774,93.537 116.641,93.537 116.641,93.53 115.851,93.53 115.851,94.647 116.313,95.11 116.825,95.11 116.825,96.55 117.175,96.9 121.05,96.9 123.85,94.1 130.975,94.1 132.45,95.575 132.45,97.7 132.05,98.1 DW1.2@132.05,99.12
R4_C16: DW1.3 S64.2 | length 7.4
  BottomLayer w0.25: DW1.3@133.95,99.12 133.95,94.4 134.15,94.2 134.853,94.2 134.853,93.53 135.644,93.53 135.644,93.537 135.776,93.537 135.785,93.545 S64.2@135.894,93.545
R4_C17: 
R4_C18: 
R4_C19: 
R4_C20: 
R4_C21: 
R05: 
R5: DK3.1 DW2.1 DW4.1 DW10.1 DW31.1 U2.2 | length 387.5
  TopLayer w0.25: v1(-93.45,106.525) -93.45,105.625 -92.125,104.3 -92.125,91.293 -89.225,88.393 v1(-89.225,85.401) ; v1(-36.475,107.425) -34.925,105.875 -34.925,79.3 v1(-35.075,79.15) ; v1(61.15,82.625) v1(61.15,107.575)
  BottomLayer w0.25: DW31.1@-128.13,82.875 -128.075,82.93 -128.075,83.625 -127.825,83.875 -123.1,83.875 -122.299,83.074 -111.07,83.074 -108.671,80.676 -104.3,80.676 ; DK3.1@-104.086,79.734 -104.086,80.461 -104.3,80.676 ; v1(-93.45,106.525) -91.125,106.525 -90.3,107.35 -36.55,107.35 v1(-36.475,107.425) 61,107.425 v1(61.15,107.575) ; v1(-89.225,85.401) -89.225,84.45 -90.644,83.031 -100.213,83.031 -102.569,80.676 -104.3,80.676 ; U2.2@-58.855,85.94 -56.885,85.94 -56.525,86.3 -56.525,88.425 -56.225,88.725 -51.925,88.725 -51.029,87.829 -51.029,80.646 -48.536,78.154 -36.771,78.154 -35.75,79.175 -35.1,79.175 v1(-35.075,79.15) ; DW10.1@61.15,81.6 v1(61.15,82.625) 61.599,83.074 75.367,83.074 76.116,82.325 96.306,82.325 97.055,83.074 106.95,83.074 107.751,83.875 112.825,83.875 ; DW4.1@113.195,82.875 113.195,83.505 112.825,83.875 ; DW2.1@132.35,83 132.35,83.525 132,83.875 128.435,83.875 127.634,83.074 118.623,83.074 117.822,83.875 112.825,83.875
r5-c7: 
R5_C0: DW31.2 S2.2 | length 27
  BottomLayer w0.25: S2.2@-146.72,74.571 -146.611,74.571 -146.602,74.563 -146.47,74.563 -146.47,74.556 -145.679,74.556 -145.679,75.674 -146.142,76.136 -146.72,76.136 -146.72,77.03 -144.125,79.625 -144.125,82.475 -143.526,83.074 -132.624,83.074 -130.425,80.875 DW31.2@-129.08,80.875
R5_C1: DW31.3 S7.1 | length 22
  BottomLayer w0.25: DW31.3@-127.18,80.875 -127.18,79.305 -126.45,78.575 -119.625,78.575 -116,74.95 -111.025,74.95 -110.5,75.475 -110.5,76.877 S7.1@-110.291,77.086
R5_C2: DK3.2 S13.1 | length 20.2
  BottomLayer w0.25: DK3.2@-104.086,76.634 -102.791,76.634 -101.548,77.877 -94.61,77.877 -92.284,75.55 -87.075,75.55 -86.541,76.084 S13.1@-86.541,77.086
R5_C3: 
R5_C5: DW10.3 S29.2 | length 102.6
  BottomLayer w0.25: S29.2@-27.974,75.321 -27.974,77.151 -27.557,77.568 -23.368,77.568 -19.454,73.654 34.554,73.654 38.75,77.85 47.25,77.85 51.332,73.768 61.543,73.768 62.1,74.325 DW10.3@62.1,79.6
R5_C6: 
R5_C8: DW10.2 S45.1 | length 6.5
  BottomLayer w0.25: S45.1@55.959,77.086 56.068,77.086 56.076,77.077 56.209,77.077 56.209,77.07 56.999,77.07 56.999,77.8 59.65,77.8 60.2,78.35 DW10.2@60.2,79.6
R5_C9: DW4.3 S51.2 | length 68.2
  BottomLayer w0.25: S51.2@67.026,74.546 67.135,74.546 67.143,74.537 67.276,74.537 67.276,74.53 68.066,74.53 68.066,75.648 67.603,76.111 67.026,76.111 67.026,77.151 67.6,77.725 71.475,77.725 74.225,74.975 82.15,74.975 83.15,75.975 83.15,81.225 83.75,81.825 94.75,81.825 95.475,81.1 95.475,79.15 96.825,77.8 102.35,77.8 105.45,74.7 112.5,74.7 114.145,76.345 DW4.3@114.145,80.875
R5_C10: 
R5_C11: 
R5_C13: DW4.2 S57.1 | length 3.6
  BottomLayer w0.25: S57.1@110.584,78.636 110.584,80.409 111.05,80.875 DW4.2@112.245,80.875
R5_C14: DW2.2 S62.1 | length 5.6
  BottomLayer w0.25: S62.1@129.584,77.086 129.693,77.086 129.701,77.077 129.834,77.077 129.834,77.07 130.624,77.07 130.624,77.9 131.05,77.9 131.4,78.25 DW2.2@131.4,81
R5_C15: DW2.3 S63.2 | length 8.9
  BottomLayer w0.25: DW2.3@133.3,81 133.3,75.6 133.6,75.3 134.853,75.3 134.853,74.53 135.644,74.53 135.644,74.537 135.776,74.537 135.785,74.545 S63.2@135.894,74.545
R5_C16: 
R5_C17: 
R5_C18: 
R5_C20: 
R6: 
R06: 
RF: 
RF-VDD: 
RR1: 
RST: 
RX: 
RX1: 
RX-A: 
S: 
SCR: 
SCR-1: 
SCRS: 
SDB: 
SG: CA1.2 CON1.5 DA1.1 RA1.1 | length 13
  BottomLayer w0.6: CON1.5@-113.775,99.1 -113.775,98.15 ; DA1.1@-113.775,94.069 -113.775,98.15 ; DA1.1@-113.775,94.069 -113.775,92.975 -113.347,92.975 DA1.1@-113.014,93.308 DA1.1@-113.224,93.517 ; DA1.1@-113.775,94.069 DA1.1@-113.224,93.517 ; -113.775,98.15 -113.224,97.599 CA1.2@-113.224,97.025 DA1.1@-113.224,93.517
SIDE_LED: 
SLED: 
sm: 
SPI_CS: R5.2 U1.1 U2.53 U7.1 | length 37.3
  BottomLayer w0.25: U2.53@-66.18,88.24 -66.18,90.444 -62.399,94.225 -52.409,94.225 -48.259,90.075 -38.575,90.075 -37.242,88.742 U1.1@-37.242,86.38
SPI_MISO: U1.2 U2.56 U7.2 | length 49.1
  TopLayer w0.25: v1(-46.95,80.5) -46.925,80.475 v1(-46.925,88.825)
  BottomLayer w0.25: U2.56@-64.68,88.24 -64.68,90.488 -61.943,93.225 -52.823,93.225 -48.4,88.802 -46.948,88.802 v1(-46.925,88.825) ; v1(-46.95,80.5) -37.696,80.5 -36.571,81.625 -35.325,81.625 -34.975,81.975 -34.975,84.625 -35.46,85.11 U1.2@-37.242,85.11
SPI_MOSI: U1.5 U2.57 U7.5 | length 29.4
  BottomLayer w0.25: U2.57@-64.18,88.24 -64.18,90.281 -61.736,92.725 -53.03,92.725 -48.132,87.827 -46.898,87.827 -46.673,87.602 -46.673,83.268 -45.975,82.57 U1.5@-44.608,82.57
SPI_SCK: U1.6 U2.55 U7.6 | length 31.4
  BottomLayer w0.25: U2.55@-65.18,88.24 -65.18,90.695 -62.15,93.725 -52.616,93.725 -48.466,89.575 -46.344,89.575 -46.125,89.356 -46.125,84.175 -45.79,83.84 U1.6@-44.608,83.84
SW: 
SW-1: 
SWCLK: J2.3 U2.49 | length 9.5
  BottomLayer w0.25: J2.3@-71.525,95.84 -70.715,95.84 -70.1,95.225 -70.1,91.675 -68.18,89.755 U2.49@-68.18,88.24
SWDIO: J2.4 U2.46 | length 22.5
  BottomLayer w0.25: J2.4@-71.525,93.3 -71.725,93.5 -77.95,93.5 -78.675,92.775 -78.675,89.2 -78.33,88.855 -74.105,88.855 -73.525,88.275 -73.525,86.3 -72.665,85.44 U2.46@-69.98,85.44
SYNC: 
TCK: 
TDI: 
TMS: 
TX: 
TX1: 
TX-A: 
USB5V: 
USB+5V: 
USB_CHG: 
V1: LED16.1 LED22.3 | length 18.8
  BottomLayer w0.35: LED22.3@51.775,86.475 53.1,86.475 54.6,84.975 LED16.1@69.925,84.975
V2: 
V3: 
V4: 
V5: 
V33: 
VB0: 
VB1: 
VB2: 
VB3: 
VB4: 
VB5: 
Vbat: 
Vbat1: 
VCC: 
VCC1.8: 
VCC-1: 
VCC-C: 
VCC-SW: 
VCC_5V: 
VCC_MCU: 
VDB1: 
VDB2: 
VDB3: 
VDB4: 
VDB5: 
VDB6: LED30.3 LED34.1 | length 14
  BottomLayer w0.25: LED34.1@-2.85,105.4 -1.8,105.4 -0.3,103.9 LED30.3@10.55,103.9
VDB7: 
VDB8: 
VDB9: 
VDB10: 
VDB11: 
VDB12: 
VDD: 
VDD1: 
VDD5V: 
VDD-B: 
VDD_led: 
VDD_USB: 
VDDA: 
VDDB: 
VDG1: 
VDG2: 
VDG3: 
VDG4: 
VDG5: 
VDG6: 
VDG7: 
VDG8: 
VDG9: 
VDG10: 
VDG11: 
VDG12: 
VDR0: 
VDR0_B: 
VDR0_B_P12: 
VDR0_G: 
VDR0_G_P11: 
VDR0_R: 
VDR0_R_P10: 
VDR1: 
VDR1_B: 
VDR1_B_P15: 
VDR1_G: 
VDR1_G_P14: 
VDR1_R: 
VDR1_R_P13: 
VDR2: 
VDR2_B: 
VDR2_B_P22: 
VDR2_G: 
VDR2_G_P21: 
VDR2_R: 
VDR2_R_P20: 
VDR3: 
VDR3_B: 
VDR3_B_P25: 
VDR3_G: 
VDR3_G_P24: 
VDR3_R: 
VDR3_R_P23: 
VDR4: 
VDR4_B: 
VDR4_B_P35: 
VDR4_G: 
VDR4_G_P34: 
VDR4_R: 
VDR4_R_P33: 
VDR5: 
VDR5_B: 
VDR5_B_P32: 
VDR5_G: 
VDR5_G_P31: 
VDR5_R: 
VDR5_R_P30: 
VDR6: 
VDR7: 
VDR8: 
VDR9: 
VDR10: 
VDR11: 
VDR12: 
VG0: 
VG1: 
VG2: 
VG3: 
VG4: 
VG5: 
VIN5V: 
VR0: 
VR1: 
VR2: 
VR3: 
VR4: 
VR5: 
WIN: 
WIN-1: 
WINS: 
XI: 
XN: 
XO: 
XP: 
ZA: C8.2 DRV1.2 J1.3@124.5,159.175 R7.1 U2.59 | length 303.5
  TopLayer w0.25: v1(11.925,145.8) 11.9,145.825 11.9,141.55 9.425,139.075 9.425,130.018 13.125,126.318 13.125,109.85 13.5,109.475 13.5,109.468 14.293,108.675 22.593,108.675 23.175,108.093 v1(23.175,88.45) ; v1(121.9,145.8) 121.875,145.825 121.875,159.9 v1(121.9,159.925)
  BottomLayer w0.25: U2.59@-63.18,88.24 -63.18,89.795 -61.25,91.725 -53.444,91.725 -50.029,88.309 -50.029,83.817 R7.1@-49.592,83.38 -49.592,80.624 -48.259,79.291 -37.491,79.291 -36.157,80.625 -33.257,80.625 -32.875,81.007 -32.875,87.028 -29.878,90.025 -18.214,90.025 -16.114,87.925 10.05,87.925 10.55,88.425 23.15,88.425 v1(23.175,88.45) ; v1(11.925,145.8) v1(121.9,145.8) ; v1(121.9,159.925) 121.9,159.4 122.05,159.25 124.425,159.25 J1.3@124.5,159.175
ZB: C7.2 DRV2.2 J1.1 R6.1 U2.58 | length 299.5
  TopLayer w0.25: v1(11.25,146.45) 11.275,146.425 11.275,141.632 8.925,139.282 8.925,129.811 12.625,126.111 12.625,109.636 14.086,108.175 21.825,108.175 22.45,107.55 v1@22.45,89.05 ; v1(122.5,146.5) v1(122.5,155.825)
  BottomLayer w0.25: U2.58@-63.68,88.24 -63.68,90.074 -61.529,92.225 -53.237,92.225 -49,87.988 -49,85.037 R6.1@-49.112,84.925 -49.112,84.637 -48.775,84.3 -48.775,80.514 -48.052,79.791 -37.698,79.791 -36.364,81.125 -33.55,81.125 -33.375,81.3 -33.375,87.236 -30.086,90.525 -18.007,90.525 -15.907,88.425 9.7,88.425 10.275,89 22.4,89 v1(22.4,89.05) ; v1(11.25,146.45) 122.5,146.45 v1(122.5,146.5) ; DRV2.2@122.45,156.7 DRV2.2@122.45,156.675 ; v1(122.5,155.825) 122.45,155.875 DRV2.2@122.45,156.675 ; J1.1@124.5,156.675 DRV2.2@122.45,156.675
pads on no net: CON1.6 CON1.7 LED38.1 SW2.1 SW2.1/1 U2.3 U2.4 U2.8 U2.14 U2.21 U2.23 U2.42 U2.50 U2.51 U2.52 U2.54 U2.61 U2.62

## Polygon pours and split planes (outlines as drawn)
GND on BottomLayer "BottomLayer-GND" (solid, remove dead copper, pour order 1040): -158.083,168.287 -156.733,166.937 -156.733,66.237 150.742,66.237 155.992,71.487 155.992,169.337
no net on BottomLayer "GND" (solid, remove dead copper, pour order 1030): -144.05,161.8
$$$30443 on BottomLayer "GND" (solid, remove dead copper, pour order 984): -42.2,78.975
R5 on BottomLayer "GND" (solid, remove dead copper, pour order 966): -144.325,98.4
R1 on BottomLayer "GND" (solid, remove dead copper, pour order 838): 83.975,145.35
R3 on BottomLayer "GND" (solid, remove dead copper, pour order 776): -65.051,122.275
C5 on BottomLayer "GND" (solid, remove dead copper, pour order 634): -13.85,94.8
C2 on BottomLayer "GND" (solid, remove dead copper, pour order 582): -92.825,104.975
C3 on BottomLayer "GND" (solid, remove dead copper, pour order 526): -55.2,107
D+ on BottomLayer "GND" (solid, remove dead copper, pour order 502): 45.625,140.625
+5V on BottomLayer "GND" (solid, remove dead copper, pour order 490): -83.575,92.175
3.3V on BottomLayer "GND" (solid, remove dead copper, pour order 468): -67.6,91.95
$$$51 on BottomLayer "GND" (solid, remove dead copper, pour order 204): 69.925,161.586
$$$50 on BottomLayer "GND" (solid, remove dead copper, pour order 194): 117.225,161.55
$$$39 on BottomLayer "GND" (solid, remove dead copper, pour order 154): -55.969,142.481
$$$20 on BottomLayer "GND" (solid, remove dead copper, pour order 66): 72.318,104.615
GND on TopLayer "TopLayer-GND" (solid, remove dead copper, pour order 1042): -163.099,171.132 -161.749,169.782 -161.749,67.207 164.351,67.207 169.126,71.982 166.576,74.532 166.576,172.332

## Keep-outs
KeepOutLayer:
  circle w0.127: c-133.899,52.172 r1.25
  circle w0.127: c126.601,-3.328 r1.25
  circle w0.127: c-133.599,-3.328 r1.25
  circle w0.127: c13.356,49.672 r1.25
  circle w0.127: c-10.394,-3.078 r1.25
  circle w0.127: c132.104,89.901 r1.25
  circle w0.127: c-128.396,145.401 r1.25
  circle w0.127: c131.804,145.401 r1.25
  circle w0.127: c-15.151,92.401 r1.25
  circle w0.127: c8.599,145.151 r1.25
  lines w0.127: -152.394,71.036 86.41,71.036 ; -152.394,71.036 -91.004,71.036 ; -152.394,71.036 -152.394,-5.588 -135.553,-5.588 cw(c-135.553,-8.588) -132.553,-8.588 -132.553,-23.578 150.599,-23.578 150.599,71.036 ; -152.394,71.036 -91.004,71.036 ; -152.394,71.036 -152.394,165.651 130.758,165.651 130.758,150.66 ccw(c133.758,150.66) 133.758,147.66 150.599,147.66 150.599,71.036 ; -152.394,71.036 86.41,71.036 ; -91.004,71.036 -88.204,71.036 ; -91.004,71.036 -88.204,71.036 ; -88.204,71.036 150.599,71.036 ; -88.204,71.036 150.599,71.036 ; 86.41,71.036 89.21,71.036 ; 86.41,71.036 89.21,71.036 ; 89.21,71.036 150.599,71.036 ; 89.21,71.036 150.599,71.036

## Other copper
BottomLayer:
  region net $$$37: -108.273,142.052

## Silkscreen, mask and mechanical layers (free items; w line width, h text height)
TopOverlay:
  text "130-83905-01" at -11.4,86.075 h3
  text "VER:03" at -8.125,83.125 h3
  text "20240319" at -9.725,80.175 h3
  text "将flash更改为窄体 20240349" at -13.15,58.625 h3
BottomOverlay:
  circle w1: c131.804,145.401 r1.764
  circle w1: c-128.396,145.401 r1.764
  circle w1: c-15.151,92.401 r1.806
  circle w1: c132.104,89.901 r1.81
  circle w1: c8.599,145.151 r1.83
  text "+" at -33.45,162.375 h1.5
  text "+" at -52.313,162.275 h1.5
  text "+" at 4.775,162.275 h1.5
  text "+" at -147.3,162.225 h1.5
  text "+" at -14.55,162.2 h1.5
  text "+" at 23.65,162.2 h1.5
  text "+" at 108.95,162.175 h1.5
  text "+" at 42.375,162.15 h1.5
  text "+" at -90.275,162.125 h1.5
  text "+" at -128.3,162.1 h1.5
  text "+" at -71.35,162.1 h1.5
  text "+" at 80.55,162.1 h1.5
  text "+" at -109.25,162.075 h1.5
  text "+" at 61.6,162.025 h1.5
  text "+" at -91.6,141.65 h1.5
  text "+" at 98.35,141.65 h1.5
  text "+" at 146.05,141.65 h1.5
  text "+" at -53.7,141.625 h1.5
  text "+" at 60.5,141.625 h1.5
  text "+" at 79.35,141.625 h1.5
  text "+" at 3.3,141.6 h1.5
  text "+" at 122.225,141.6 h1.5
  text "+" at 22.35,141.575 h1.5
  text "+" at 41.4,141.575 h1.5
  text "+" at -72.75,141.55 h1.5
  text "+" at -34.4,141.55 h1.5
  text "+" at -15.5,141.55 h1.5
  text "+" at -110.525,141.525 h1.5
  text "+" at -134.175,141.5 h1.5
  text "+" at -140.141,124.299 h1.5
  text "+" at -114.021,124.299 h1.5
  text "+" at -95.011,124.299 h1.5
  text "+" at -76.021,124.299 h1.5
  text "+" at -57.018,124.299 h1.5
  text "+" at -38.021,124.299 h1.5
  text "+" at -19.024,124.299 h1.5
  text "+" at -0.011,124.299 h1.5
  text "+" at 18.976,124.299 h1.5
  text "+" at 37.979,124.299 h1.5
  text "+" at 56.984,124.299 h1.5
  text "+" at 75.979,124.299 h1.5
  text "+" at 106.859,124.299 h1.5
  text "+" at 137.736,124.299 h1.5
  text "+" at -39.786,104.101 h1.5 r180
  text "+" at -96.786,104.076 h1.5 r180
  text "+" at -77.786,104.076 h1.5 r180
  text "+" at -58.796,104.076 h1.5 r180
  text "+" at -20.811,104.076 h1.5 r180
  text "+" at -1.786,104.076 h1.5 r180
  text "+" at 17.214,104.076 h1.5 r180
  text "+" at 36.214,104.076 h1.5 r180
  text "+" at 55.203,104.076 h1.5 r180
  text "+" at 74.201,104.076 h1.5 r180
  text "+" at 100.329,104.076 h1.5 r180
  text "+" at 126.444,104.076 h1.5 r180
  text "+" at 145.464,104.076 h1.5 r180
  text "+" at -127.667,103.902 h1.5 r180
  text "V D+D-G" at -114.125,100.625 h0.8
  text "+" at -144.914,86.299 h1.5
  text "+" at -121.739,86.299 h1.5
  text "+" at -97.489,86.299 h1.5
  text "+" at -26.564,86.299 h1.5
  text "+" at 45.111,86.299 h1.5
  text "+" at 68.861,86.299 h1.5
  text "+" at 99.734,86.299 h1.5
  text "+" at 118.725,86.299 h1.5
  text "+" at 137.711,86.299 h1.5
  text "130-83905-01" at 5.95,86.25 h3
  text "VER:03" at 1.225,83.35 h3
  text "20240319" at 4.225,80.1 h3
Mechanical1:
  drawing of 676 lines, arcs and shapes, not listed
Mechanical4:
  lines w0.127: -251.263,-481.037 -249.903,-480.403 -248.128,-484.209 -249.488,-484.843 ; -251.082,-478.961 -249.853,-479.822 -247.444,-476.381 -248.673,-475.521 ; -250.992,-576.333 -250.992,-555.221 ; -249.853,-500.379 -248.353,-500.379 -248.353,-504.579 -249.853,-504.579 -253.204,-510.383 -253.204,-516.214 -249.555,-520.127 -248.146,-520.64 -249.582,-524.587 -250.992,-524.074 -253.204,-525.93 -253.204,-528.225 -248.744,-534.595 -247.267,-534.855 -247.996,-538.991 -249.473,-538.731 -252.084,-541.842 -248.888,-547.378 -247.388,-547.378 -247.388,-551.578 -248.888,-551.578 ; 85.635,-475.521 84.407,-476.381 86.816,-479.822 88.044,-478.961 ; 85.706,-534.595 84.229,-534.855 84.958,-538.991 86.436,-538.731 89.046,-541.842 85.85,-547.378 84.35,-547.378 84.35,-551.578 85.85,-551.578 ; 86.45,-484.843 85.09,-484.209 86.865,-480.403 88.225,-481.037 ; 86.517,-520.127 85.108,-520.64 86.544,-524.587 87.954,-524.074 ; 86.816,-504.579 85.316,-504.579 85.316,-500.379 86.816,-500.379

## Text inside footprints (layer, text, board x,y; h text height)
LED26: Mechanical6 "DIN" at 28.92,104.194 h0.5 r180; Mechanical6 "GND" at 28.793,105.718 h0.5 r180; Mechanical6 "VDD" at 34.635,104.194 h0.5 r180; Mechanical6 "DOUT" at 34.508,105.718 h0.5 r180
LED27: Mechanical6 "DIN" at 31.029,162.156 h0.5; Mechanical6 "GND" at 31.156,160.632 h0.5; Mechanical6 "VDD" at 25.314,162.156 h0.5; Mechanical6 "DOUT" at 25.441,160.632 h0.5
LED28: Mechanical6 "DIN" at 26.27,124.181 h0.5; Mechanical6 "GND" at 26.397,122.657 h0.5; Mechanical6 "VDD" at 20.555,124.181 h0.5; Mechanical6 "DOUT" at 20.682,122.657 h0.5
LED29: Mechanical6 "DIN" at 14.67,142.244 h0.5 r180; Mechanical6 "GND" at 14.543,143.768 h0.5 r180; Mechanical6 "VDD" at 20.385,142.244 h0.5 r180; Mechanical6 "DOUT" at 20.258,143.768 h0.5 r180
LED30: Mechanical6 "DIN" at 9.92,104.194 h0.5 r180; Mechanical6 "GND" at 9.793,105.718 h0.5 r180; Mechanical6 "VDD" at 15.635,104.194 h0.5 r180; Mechanical6 "DOUT" at 15.508,105.718 h0.5 r180
LED31: Mechanical6 "DIN" at 12.029,162.156 h0.5; Mechanical6 "GND" at 12.156,160.632 h0.5; Mechanical6 "VDD" at 6.314,162.156 h0.5; Mechanical6 "DOUT" at 6.441,160.632 h0.5
LED32: Mechanical6 "DOUT" at 1.695,122.657 h0.5; Mechanical6 "VDD" at 1.568,124.181 h0.5; Mechanical6 "GND" at 7.41,122.657 h0.5; Mechanical6 "DIN" at 7.283,124.181 h0.5
LED33: Mechanical6 "DIN" at -4.33,142.244 h0.5 r180; Mechanical6 "GND" at -4.457,143.768 h0.5 r180; Mechanical6 "VDD" at 1.385,142.244 h0.5 r180; Mechanical6 "DOUT" at 1.258,143.768 h0.5 r180
LED34: Mechanical6 "DIN" at -9.08,104.194 h0.5 r180; Mechanical6 "GND" at -9.207,105.718 h0.5 r180; Mechanical6 "VDD" at -3.365,104.194 h0.5 r180; Mechanical6 "DOUT" at -3.492,105.718 h0.5 r180
LED35: Mechanical6 "DIN" at -6.982,162.156 h0.5; Mechanical6 "GND" at -6.855,160.632 h0.5; Mechanical6 "VDD" at -12.697,162.156 h0.5; Mechanical6 "DOUT" at -12.57,160.632 h0.5
LED36: Mechanical6 "DIN" at -11.73,124.181 h0.5; Mechanical6 "GND" at -11.603,122.657 h0.5; Mechanical6 "VDD" at -17.445,124.181 h0.5; Mechanical6 "DOUT" at -17.318,122.657 h0.5
LED37: Mechanical6 "DIN" at -23.33,142.244 h0.5 r180; Mechanical6 "GND" at -23.457,143.768 h0.5 r180; Mechanical6 "VDD" at -17.615,142.244 h0.5 r180; Mechanical6 "DOUT" at -17.742,143.768 h0.5 r180
LED38: Mechanical6 "DIN" at -18.72,86.181 h0.5; Mechanical6 "GND" at -18.593,84.657 h0.5; Mechanical6 "VDD" at -24.435,86.181 h0.5; Mechanical6 "DOUT" at -24.308,84.657 h0.5
LED39: Mechanical6 "DIN" at -28.105,104.194 h0.5 r180; Mechanical6 "GND" at -28.232,105.718 h0.5 r180; Mechanical6 "VDD" at -22.39,104.194 h0.5 r180; Mechanical6 "DOUT" at -22.517,105.718 h0.5 r180
LED40: Mechanical6 "DIN" at -25.991,162.156 h0.5; Mechanical6 "GND" at -25.864,160.632 h0.5; Mechanical6 "VDD" at -31.706,162.156 h0.5; Mechanical6 "DOUT" at -31.579,160.632 h0.5
LED41: Mechanical6 "DIN" at -30.727,124.181 h0.5; Mechanical6 "GND" at -30.6,122.657 h0.5; Mechanical6 "VDD" at -36.442,124.181 h0.5; Mechanical6 "DOUT" at -36.315,122.657 h0.5
LED42: Mechanical6 "DIN" at -42.305,142.244 h0.5 r180; Mechanical6 "GND" at -42.432,143.768 h0.5 r180; Mechanical6 "VDD" at -36.59,142.244 h0.5 r180; Mechanical6 "DOUT" at -36.717,143.768 h0.5 r180
LED43: Mechanical6 "DIN" at -47.08,104.219 h0.5 r180; Mechanical6 "GND" at -47.207,105.743 h0.5 r180; Mechanical6 "VDD" at -41.365,104.219 h0.5 r180; Mechanical6 "DOUT" at -41.492,105.743 h0.5 r180
LED44: Mechanical6 "DIN" at -44.986,162.156 h0.5; Mechanical6 "GND" at -44.859,160.632 h0.5; Mechanical6 "VDD" at -50.701,162.156 h0.5; Mechanical6 "DOUT" at -50.574,160.632 h0.5
LED45: Mechanical6 "DIN" at -49.724,124.181 h0.5; Mechanical6 "GND" at -49.597,122.657 h0.5; Mechanical6 "VDD" at -55.439,124.181 h0.5; Mechanical6 "DOUT" at -55.312,122.657 h0.5
LED46: Mechanical6 "DIN" at -61.33,142.244 h0.5 r180; Mechanical6 "GND" at -61.457,143.768 h0.5 r180; Mechanical6 "VDD" at -55.615,142.244 h0.5 r180; Mechanical6 "DOUT" at -55.742,143.768 h0.5 r180
LED47: Mechanical6 "DIN" at -66.09,104.194 h0.5 r180; Mechanical6 "GND" at -66.217,105.718 h0.5 r180; Mechanical6 "VDD" at -60.375,104.194 h0.5 r180; Mechanical6 "DOUT" at -60.502,105.718 h0.5 r180
LED48: Mechanical6 "DIN" at -63.996,162.156 h0.5; Mechanical6 "GND" at -63.869,160.632 h0.5; Mechanical6 "VDD" at -69.711,162.156 h0.5; Mechanical6 "DOUT" at -69.584,160.632 h0.5
LED49: Mechanical6 "DIN" at -68.727,124.181 h0.5; Mechanical6 "GND" at -68.6,122.657 h0.5; Mechanical6 "VDD" at -74.442,124.181 h0.5; Mechanical6 "DOUT" at -74.315,122.657 h0.5
LED50: Mechanical6 "DIN" at -80.33,142.244 h0.5 r180; Mechanical6 "GND" at -80.457,143.768 h0.5 r180; Mechanical6 "VDD" at -74.615,142.244 h0.5 r180; Mechanical6 "DOUT" at -74.742,143.768 h0.5 r180
LED51: Mechanical6 "DIN" at -85.08,104.219 h0.5 r180; Mechanical6 "GND" at -85.207,105.743 h0.5 r180; Mechanical6 "VDD" at -79.365,104.219 h0.5 r180; Mechanical6 "DOUT" at -79.492,105.743 h0.5 r180
LED52: Mechanical6 "DIN" at -82.971,162.156 h0.5; Mechanical6 "GND" at -82.844,160.632 h0.5; Mechanical6 "VDD" at -88.686,162.156 h0.5; Mechanical6 "DOUT" at -88.559,160.632 h0.5
LED53: Mechanical6 "DIN" at -87.717,124.181 h0.5; Mechanical6 "GND" at -87.59,122.657 h0.5; Mechanical6 "VDD" at -93.432,124.181 h0.5; Mechanical6 "DOUT" at -93.305,122.657 h0.5
LED54: Mechanical6 "DIN" at -90.07,86.106 h0.5; Mechanical6 "GND" at -89.943,84.582 h0.5; Mechanical6 "VDD" at -95.785,86.106 h0.5; Mechanical6 "DOUT" at -95.658,84.582 h0.5
LED55: Mechanical6 "DIN" at -99.33,142.244 h0.5 r180; Mechanical6 "GND" at -99.457,143.768 h0.5 r180; Mechanical6 "VDD" at -93.615,142.244 h0.5 r180; Mechanical6 "DOUT" at -93.742,143.768 h0.5 r180
LED56: Mechanical6 "DIN" at -104.08,104.194 h0.5 r180; Mechanical6 "GND" at -104.207,105.718 h0.5 r180; Mechanical6 "VDD" at -98.365,104.194 h0.5 r180; Mechanical6 "DOUT" at -98.492,105.718 h0.5 r180
LED57: Mechanical6 "DIN" at -101.971,162.156 h0.5; Mechanical6 "GND" at -101.844,160.632 h0.5; Mechanical6 "VDD" at -107.686,162.156 h0.5; Mechanical6 "DOUT" at -107.559,160.632 h0.5
LED58: Mechanical6 "DIN" at -106.727,124.181 h0.5; Mechanical6 "GND" at -106.6,122.657 h0.5; Mechanical6 "VDD" at -112.442,124.181 h0.5; Mechanical6 "DOUT" at -112.315,122.657 h0.5
LED59: Mechanical6 "DIN" at -118.305,142.244 h0.5 r180; Mechanical6 "GND" at -118.432,143.768 h0.5 r180; Mechanical6 "VDD" at -112.59,142.244 h0.5 r180; Mechanical6 "DOUT" at -112.717,143.768 h0.5 r180
LED60: Mechanical6 "DIN" at -114.095,86.081 h0.5; Mechanical6 "GND" at -113.968,84.557 h0.5; Mechanical6 "VDD" at -119.81,86.081 h0.5; Mechanical6 "DOUT" at -119.683,84.557 h0.5
LED61: Mechanical6 "DIN" at -120.971,162.156 h0.5; Mechanical6 "GND" at -120.844,160.632 h0.5; Mechanical6 "VDD" at -126.686,162.156 h0.5; Mechanical6 "DOUT" at -126.559,160.632 h0.5
LED62: Mechanical6 "DIN" at -134.961,104.019 h0.5 r180; Mechanical6 "GND" at -135.088,105.543 h0.5 r180; Mechanical6 "VDD" at -129.246,104.019 h0.5 r180; Mechanical6 "DOUT" at -129.373,105.543 h0.5 r180
LED63: Mechanical6 "DOUT" at -138.435,122.657 h0.5; Mechanical6 "VDD" at -138.562,124.181 h0.5; Mechanical6 "GND" at -132.72,122.657 h0.5; Mechanical6 "DIN" at -132.847,124.181 h0.5
LED64: Mechanical6 "DIN" at -142.066,142.244 h0.5 r180; Mechanical6 "GND" at -142.193,143.768 h0.5 r180; Mechanical6 "VDD" at -136.351,142.244 h0.5 r180; Mechanical6 "DOUT" at -136.478,143.768 h0.5 r180
LED65: Mechanical6 "DIN" at -137.62,86.181 h0.5; Mechanical6 "GND" at -137.493,84.657 h0.5; Mechanical6 "VDD" at -143.335,86.181 h0.5; Mechanical6 "DOUT" at -143.208,84.657 h0.5
LED66: Mechanical6 "DOUT" at -145.558,160.632 h0.5; Mechanical6 "VDD" at -145.685,162.156 h0.5; Mechanical6 "GND" at -139.843,160.632 h0.5; Mechanical6 "DIN" at -139.97,162.156 h0.5